# Altium PCB ECG_Final.PcbDoc (part 1 of 3)
Units mil, origin at the board's own origin, x right, y up, seen from the top; angles counter-clockwise.
Board outline 2555.63 x 1380.57 mil, 4 copper layers (Top Layer, Layer 1, Layer 2, Bottom Layer), stack 61.583 mil thick; 110 components, 95 nets, 402 pads, 94 vias.
Unrouted connection lines stored in the file: 82.
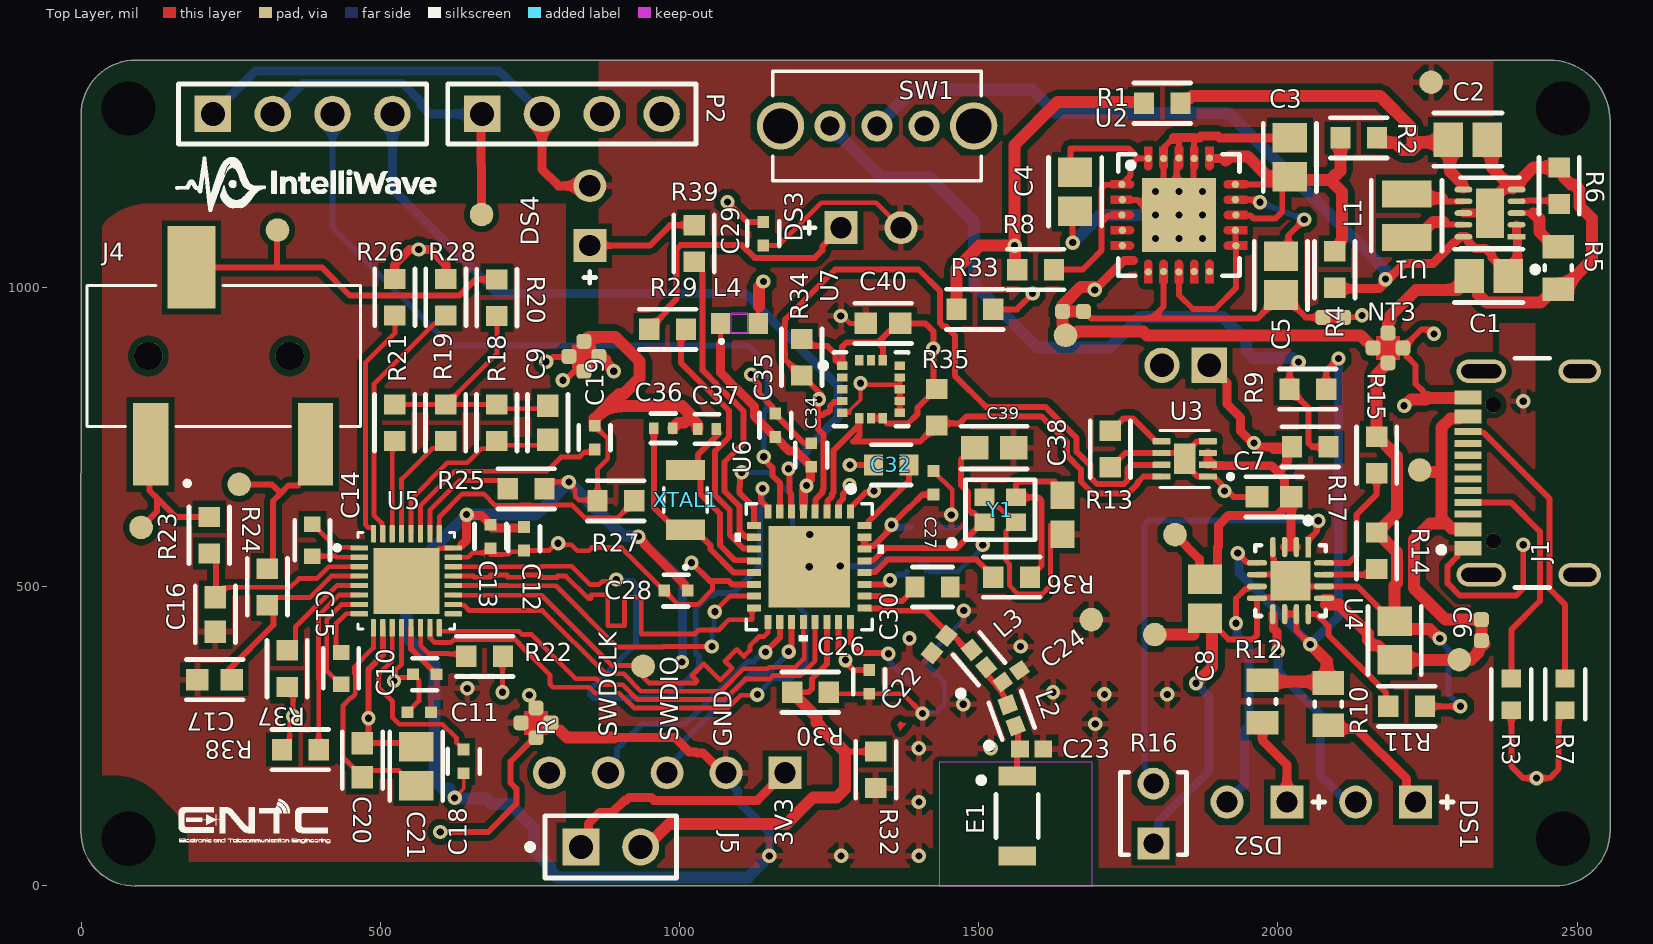
[diagram p0: Top Layer view]
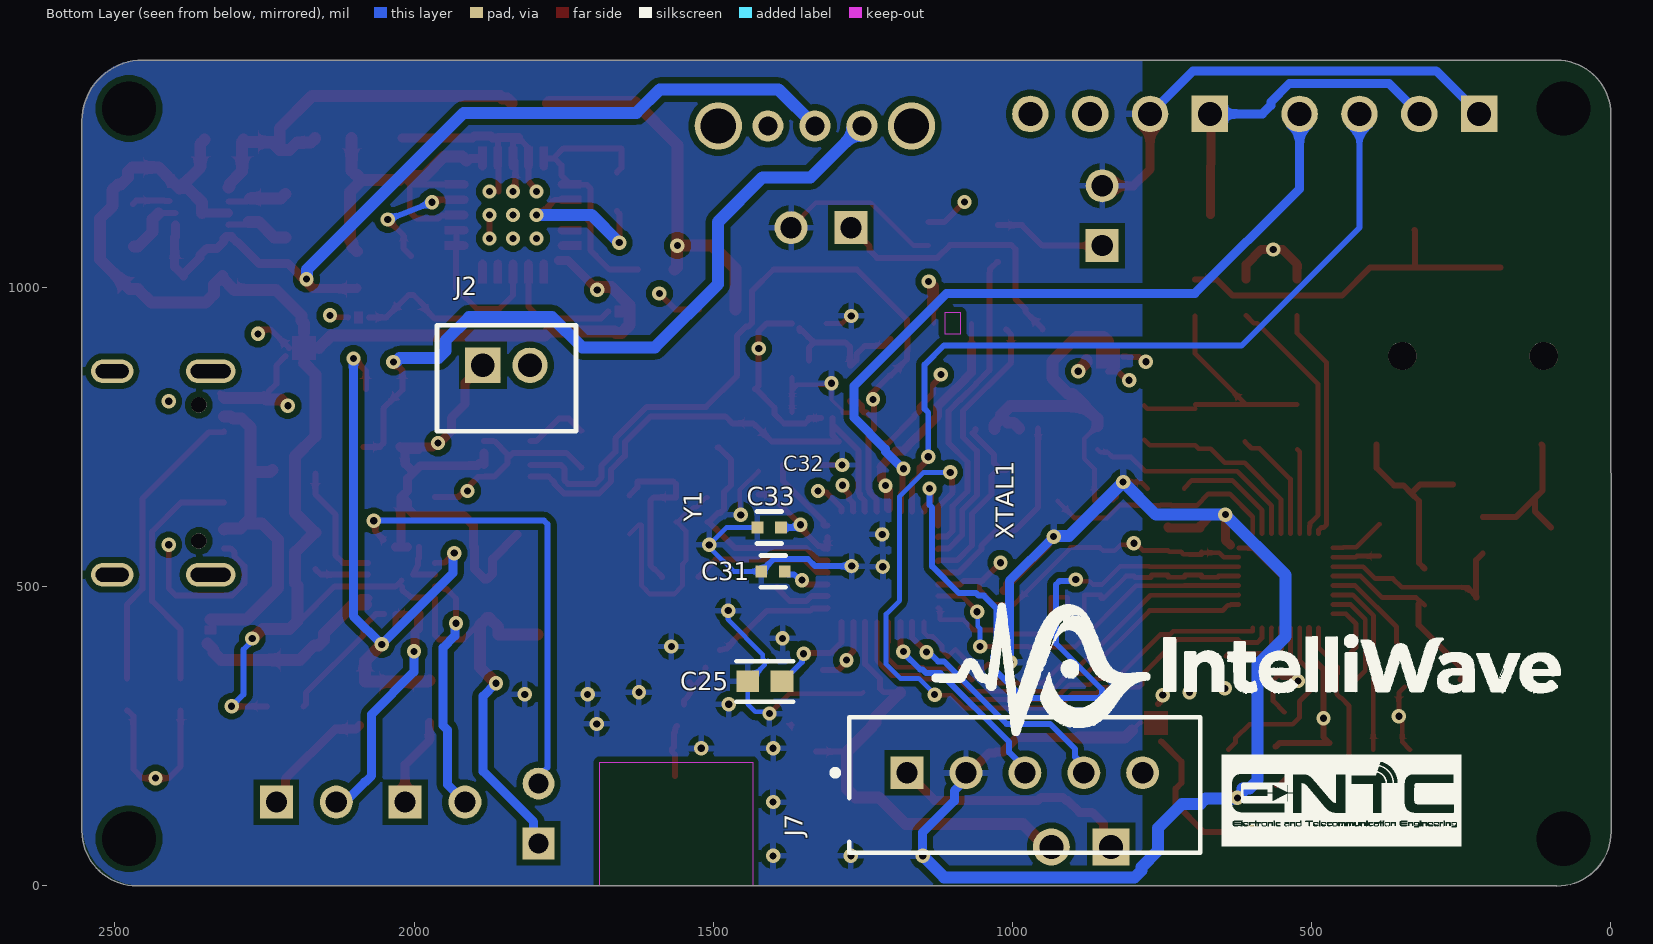
[diagram p1: Bottom Layer view, seen from below]
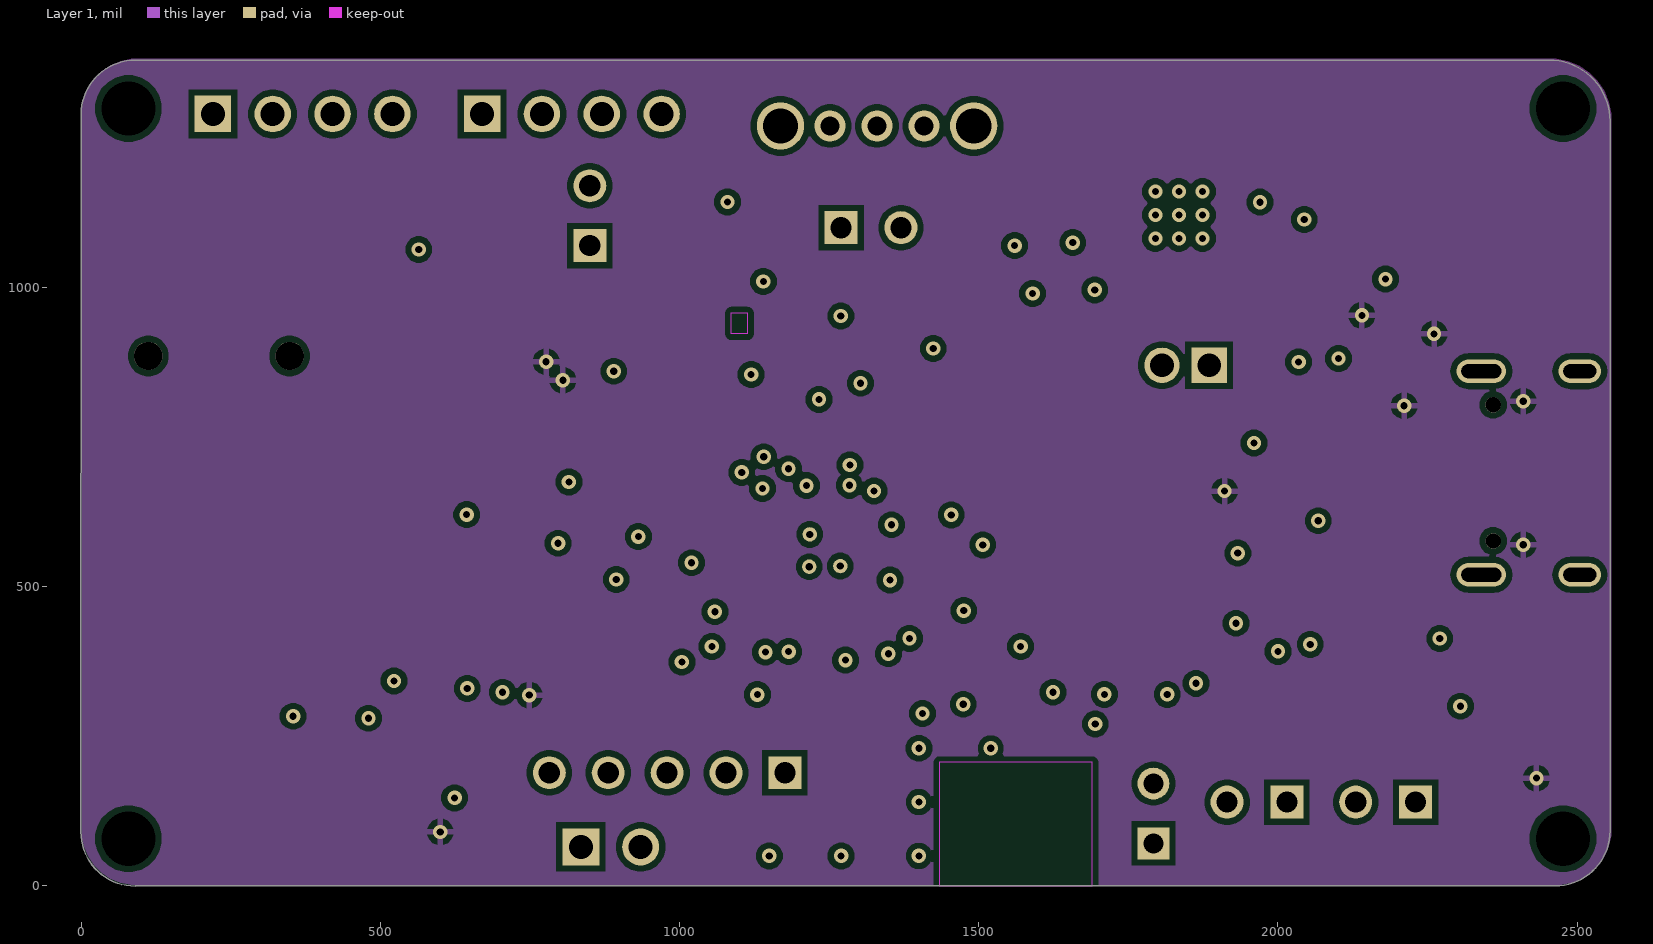
[diagram p2: Layer 1]
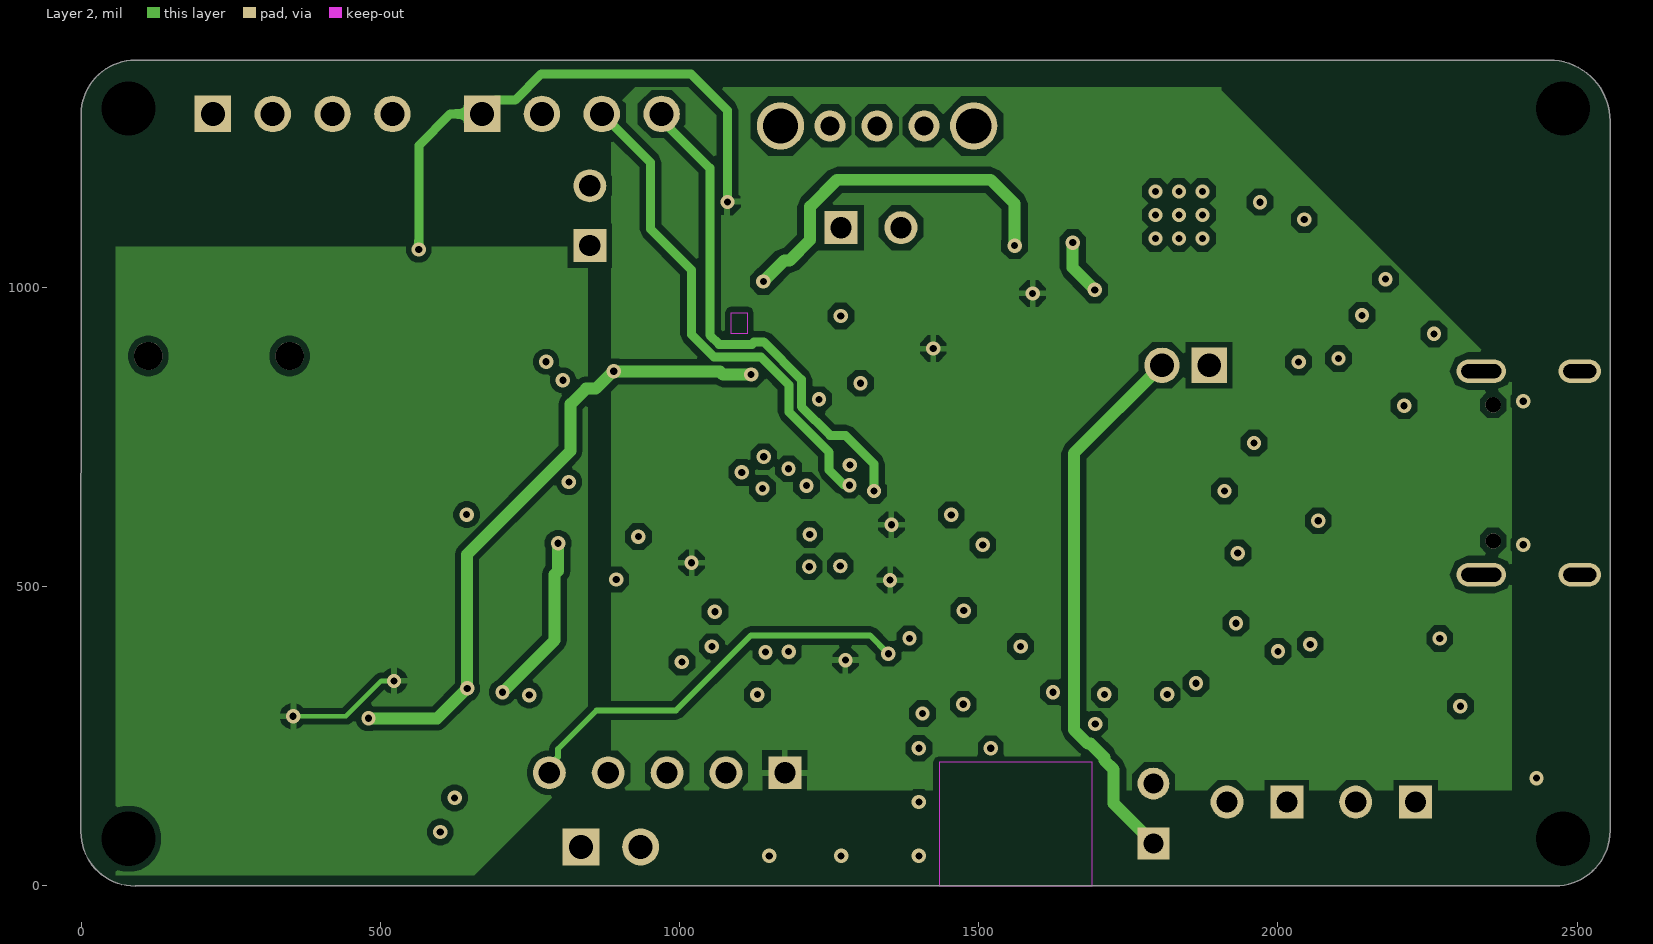
[diagram p3: Layer 2]
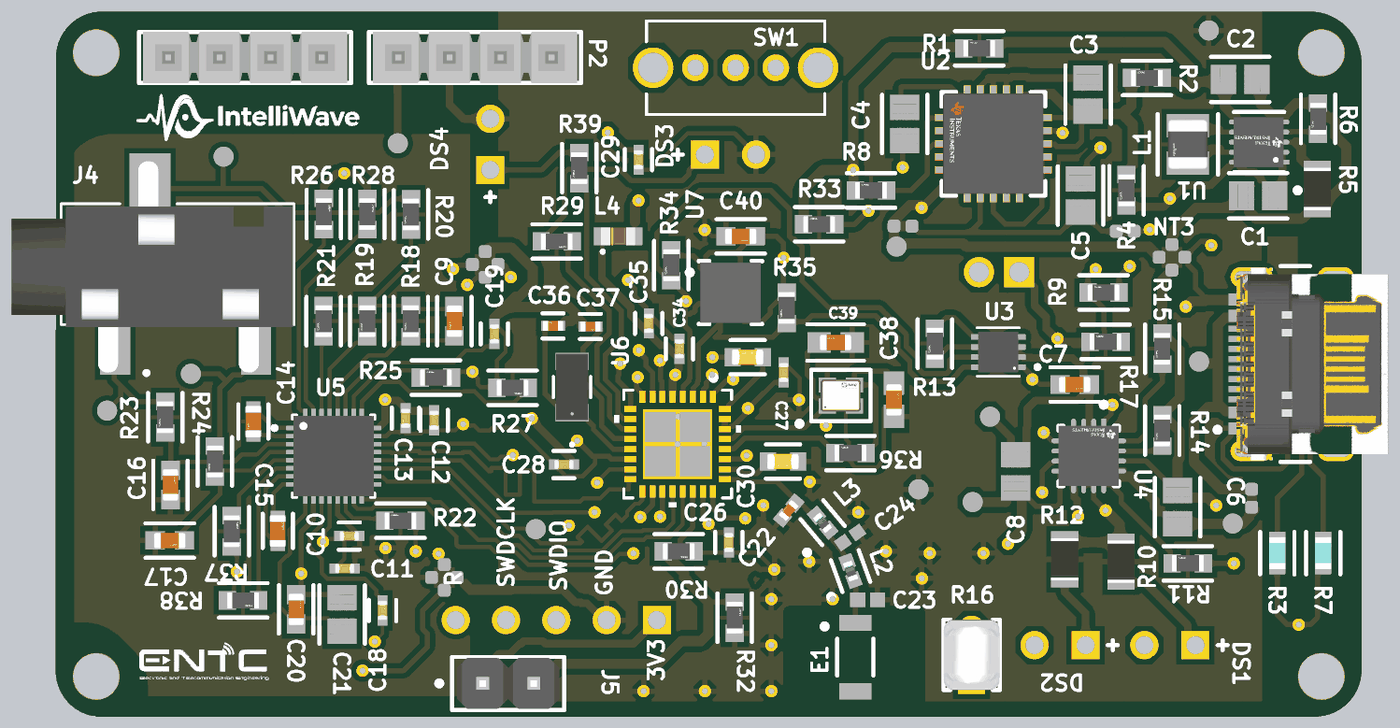
[diagram p5: 3D render of the assembled board from above, using the file's embedded part models]
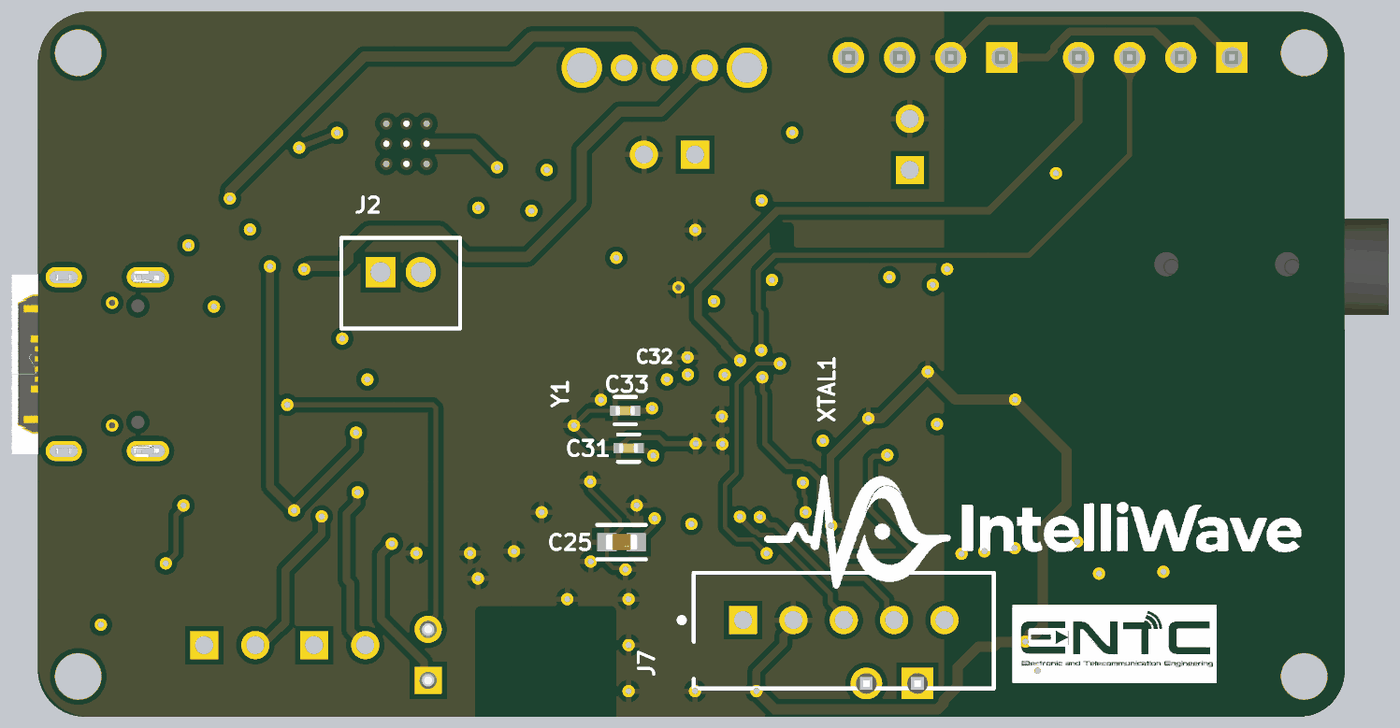
[diagram p6: 3D render of the assembled board from below, using the file's embedded part models]

## Layer stack, top to bottom
Top Solder: solder mask 0.4, Solder Resist, Dk 3.5
Top Layer: signal copper 1.378
Dielectric 2: prepreg 3.9134, PP-006, Dk 4.1
Layer 1: signal copper 0.5984
Dielectric 1: dielectric 49.8031, FR-4, Dk 4.8
Layer 2: signal copper 0.5984
Dielectric 3: prepreg 3.9134, PP-006, Dk 4.1
Bottom Layer: signal copper 1.378
Bottom Solder: solder mask 0.4, Solder Resist, Dk 3.5

## Board outline
-0.55,90 ccw(c90,90) 90,-0.55 90,0 2463.35,0 ccw(c2463.35,91.72) 2555.08,91.72 2555.08,1278.26 ccw(c2453.32,1278.26) 2453.32,1380.02 90.57,1380.02 90.55,1380 ccw(c90.55,1289.45) 0,1289.45

## Design rules (kind name [scope] priority, off if disabled: settings)
Clearance [All] p1: gap=10 ignorepadtopadclearanceinfootprint=FALSE except(5.91: Arc-SMDPad Track-SMDPad SMDPad-SMDPad; 6: Arc-Arc Arc-Track Arc-Text Track-Track Track-Text SMDPad-Text THPad-Text Via-Text Fill-Text Poly-Text Region-Text Text-Text)
MatchedLengths SPI_LENGTH_MATCH [InNetClass('SPI_MCU')] p1: tolerance=39.37 checknetsindiffpair=FALSE checkdiffpairvsdiffpair=TRUE checkxsignals=TRUE checkothers=TRUE
MinimumSolderMaskSliver [All] p1: minsoldermaskwidth=5.91
PolygonConnect [All] p1: connectstyle=Relief reliefconductorwidth=10 reliefentries=4 polygonreliefangle="90 Angle" airgapwidth=10
RoutingVias [All] p1: holewidth=28 width=50 viastyle="Through Hole" minholewidth=28 minwidth=50 maxholewidth=28 maxwidth=50
SilkToSilkClearance [All] p1: silktosilkclearance=6
SilkToSolderMaskClearance [IsPad] p1: minsilkscreentomaskgap=5.51 clearancetoexposedcopper=TRUE
SolderMaskExpansion [All] p1: expansion=0 istentingtop=FALSE
SupplyNets "Schematic Supply Nets_3" [InNet('DVDD')] p1: voltage=0.000
SupplyNets "Schematic Supply Nets_2" [InNet('Vin')] p2: voltage=0.000
SupplyNets "Schematic Supply Nets_1" [InNet('AVDD')] p3: voltage=0.000
SupplyNets "Schematic Supply Nets" [InNet('GND')] p4: voltage=0.000
Width [All] p1: maxlimit=30 minlimit=4 preferedwidth=10
27 further rules are at their usual default settings.

## Classes and differential pairs
net class SPI_MCU: ADS_CS ADS_DIN ADS_DOUT ADS_SCLK
component class ECG_PWR_MGMT: C1 C2 C3 C4 C5 C6 C7 C8 DS1 DS2 J1 J2 L1 NT3 R1 R2 R3 R4 R5 R6 R7 R8 R9 R10 R11 R12 R13 R14 R15 R16 R17 SW1 U1 U2 U3 U4
component class ECG_AFE_ADS1292: C9 C10 C11 C12 C13 C14 C15 C16 C17 C18 C19 C20 J4 R18 R19 R20 R21 R22 R23 R24 R25 R26 R27 R28 R37 R38 U5

## Components (designator, comment, footprint, x,y, rotation, side; value= is the part's Value field where it differs from the comment)
*1 "NET-TIE SMD" "NET TIE SMD" 760,277.5 r0 top net-tie
C1 "10uF" CAP-0805-IPC_B 2352.49,1019.33 r0 top value=10µF
C2 "22uF" CAP-0805-IPC_B 2317.49,1247.12 r180 top value=22µF
C3 "10uF" CAP-0805-IPC_B 2020,1217.49 r270 top value=10µF
C4 "10uF" CAP-0805-IPC_B 1661,1160 r90 top value=10µF
C5 "1uF" CAP-0805-IPC_B 2005,1020 r90 top
C6 "1uF" CAP-0805-IPC_B 2195,410 r270 top
C7 "100nF" CAP-0603-IPC_B 1993.61,650 r0 top
C8 "4.7uF" CAP-0805-IPC_B 1878,480 r90 top
C9 "6.8nF" CAP-0603-IPC_B 779.68,774.03 r270 top
C10 "100nF, 402" FP-CC0402-MFG 574.13,353.55 r0 top value="100 nF"
C11 "1uF, 402" FP-CC0402-MFG 565,290 r180 top value="1 uF"
C12 "1uF, 402" FP-CC0402-MFG 740,580 r90 top value="1 uF"
C13 "100nF, 402" FP-CC0402-MFG 684.13,583.94 r270 top value="100 nF"
C14 "4.7nF 402" FP-GRM188-0_1-e0_2_0_5-MFG 386.23,577.63 r270 top
C15 "4.7nF 402" FP-GRM188-0_1-e0_2_0_5-MFG 434.13,363.55 r90 top
C16 "1nF,603" CAP-0603-IPC_B 224.13,453.55 r90 top
C17 "1nF,603" CAP-0603-IPC_B 222.75,344.65 r0 top
C18 "1uF, 402" FP-CC0402-MFG 639,208 r90 top value="1 uF"
C19 "1uF, 402" FP-CC0402-MFG 858.06,749.08 r270 top value="1 uF"
C20 "100nF,603" CAP-0603-IPC_B 470,210 r90 top
C21 "10uF,805" CAP-0805-IPC_B 560,200 r90 top value=10µF
C22 "2.7pF, 402" FP-GJM155-0_05-IPC_A 1434.13,403.55 r230 top
C23 "1.5pF, 402" CAPC1005X55X25ML05T10 1588.43,228.75 r180 top
C24 "3.9pF, 402" CAPC1005X55X25NL05T10 1554.23,350.62 r35 top
C25 "100nF 603" CAP-0603-IPC_B 1413.76,341.59 r180 bottom
C26 "100nF, 402" FP-CC0402-MFG 1316.87,340.84 r270 top value="100 nF"
C27 "100nF, 402" FP-CC0402-MFG 1424.13,673.55 r90 top value="100 nF"
C28 "100nF, 402" FP-CC0402-MFG 994.13,493.55 r0 top value="100 nF"
C29 "100nF, 402" FP-CC0402-MFG 1140,1090 r270 top value="100 nF"
C30 "470nF,603" FP-CC0603-DA-MFG 1422.8,499.33 r0 top value="470 nF"
C31 "100nF,402" FP-CC0402-MFG 1400.07,525.42 r0 bottom value="100 nF"
C32 "4.7uF , 603" FP-CC0603-DA-MFG 1353.66,703.55 r180 top value="4.7 uF"
C33 "100nF, 402" FP-CC0402-MFG 1406.54,598.75 r0 bottom value="100 nF"
C34 "100nF, 402" FP-CC0402-MFG 1220,720 r90 top value="100 nF"
C35 "1uF, 402" FP-CC0402-MFG 1160,769.68 r90 top value="1 uF"
C36 "6nF" FP-GJM155-0_05-MFG 972.82,764.68 r180 top
C37 "6nF" FP-GJM155-0_05-MFG 1045.81,763.55 r0 top
C38 "CAP-0603-16pF" FP-GCM188-0_1-IPC_A_murata 1640,620 r90 top
C39 "CAP-0603-16pF" FP-GCM188-0_1-IPC_A_murata 1525.71,732.25 r180 top
C40 "100nF" CAP-0603-IPC_B 1340,940 r0 top
DS1 "LTL-1CHG" LTST-LTL-1CHG-2 2180,140 r180 top
DS2 "LTL-1CHG" LTST-LTL-1CHG-2 1965,140 r180 top
DS3 "LTL-1CHG" LTST-LTL-1CHG-2 1320,1100 r0 top
DS4 "LTL-1CHG" LTST-LTL-1CHG-2 850,1120 r90 top
E1 "2450AT18A100E" JT-2450AT18A100-2_V 1564.13,116.62 r270 top
J1 "USB4105-GF-A" FP-USB4105-GF-A-MFG 2458.7,690.08 r90 top locked
J2 "B2B-PH-K-S(LF)(SN)" JST-B2B-PH-K-S_V 1845.63,848.35 r180 bottom locked
J4 "3.5mm audio PJ-320B" "3.5mm Audio PJ-320B" 230.13,885.55 r0 top
J5 "M20-9990246" FP-M20-9990246-MFG 885,65 r0 top
J7 "B5B-XH-AM(LF)(SN)" FP-B5B-XH-AM_LF_SN-MFG 979.15,168.33 r0 bottom
L1 "LQM2HPN2R2MG0L" FP-LQM2HPN_G0-IPC_C 2215,1120 r270 top
L2 "1.8nH" FP-LQG15HH_02-IPC_A 1555,285 r110 top
L3 "1.3nH" FP-LQG15HH_02-IPC_A 1500.48,379.67 r130 top
L4 "Ferrite bead" IND_LSMG_160808_TAY 1100,940 r0 top
NT1 "NET-TIE 2pin SMD" "NET TIE SMD 2 pin" 2340,430 r90 top net-tie
NT2 "NET-TIE 2pin SMD" "NET TIE SMD 2 pin" 1660,960 r0 top net-tie
NT3 "NET-TIE SMD" "NET TIE SMD" 2179.01,899.01 r90 top net-tie
NT4 "NET-TIE 2pin SMD" "NET TIE SMD 2 pin" 2090,950 r180 top net-tie
NT5 "NET-TIE SMD" "NET TIE SMD" 840,880 r180 top net-tie
P1 "TSW-104-08-G-S" SMTC-TSW-104-08-X-S 220,1290 r0 top
P2 "TSW-104-08-G-S" SMTC-TSW-104-08-X-S 670,1290 r0 top
R1 "0 ohm" RES-0603-IPC_B 1806.8,1307.96 r180 top
R2 "0 ohm" RES-0603-IPC_B 2135,1250 r180 top
R3 "RK73H1JRTTD5101F" FP-RK73H1J-IPC_C 2390,320 r90 top
R4 "0 ohm" RES-0603-IPC_B 2095,1030 r270 top
R5 "1.87k" "RES 0805 Medium" 2468.41,1032.79 r90 top value=1.87kΩ
R6 "8.25k" RES-0603-IPC_B 2470,1170 r270 top value=8.25kΩ
R7 "RK73H1JRTTD5101F" FP-RK73H1J-IPC_C 2480,320 r90 top
R8 "0 ohm" RES-0603-IPC_B 1595,1030 r180 top
R9 "0 ohm" RES-0603-IPC_B 2050,830 r180 top
R10 "1.5k" "RES 0805 Medium" 2084.13,303.55 r90 top
R11 "1.18k" RES-0603-IPC_B 2215,300 r180 top
R12 "1.5k" "RES 0805 Medium" 1974.13,308.12 r90 top
R13 "1k RES-0603-IPC-B_1" RES-0603-IPC_B 1720,730 r270 top
R14 "4.12k" RES-0603-IPC_B 2165,560 r270 top
R15 "1.13k" RES-0603-IPC_B 2165,720 r270 top
R16 "NTCLE101E3C90173" FP-NTCLE101E3C90173-MFG 1792,121 r90 top
R17 "0 ohm" RES-0603-IPC_B 2054.13,733.55 r180 top
R18 "1M 603" RES-0603-IPC_B 694.4,774.03 r270 top
R19 "100k 603" RES-0603-IPC_B 609.12,774.03 r270 top
R20 "100k" RES-0603-IPC_B 694.7,982.97 r270 top
R21 "0ohm ,603" RES-0603-IPC_B 523.84,774.03 r270 top
R22 "10k,603" RES-0603-IPC_B 674.13,383.55 r180 top
R23 "2.2k 603" RES-0603-IPC_B 213.94,586.08 r270 top
R24 "2.2k 603" RES-0603-IPC_B 310.96,499.48 r270 top
R25 "10k" RES-0603-IPC_B 743.56,663.55 r180 top
R26 "10k,603" RES-0603-IPC_B 524.13,983.79 r90 top
R27 "10k" RES-0603-IPC_B 893.52,643.55 r0 top
R28 "10k,603" RES-0603-IPC_B 609.42,983.79 r90 top
R29 "S" RES-0603-IPC_B 980,930 r0 top
R30 "10k 603" RES-0603-IPC_B 1218.72,323.53 r0 top
R32 "100k" RES-0603-IPC_B 1328.23,193.87 r90 top
R33 "0 ohm" RES-0603-IPC_B 1493.56,963.55 r180 top
R34 "10k" RES-0603-IPC_B 1204.13,883.55 r270 top
R35 "10k" RES-0603-IPC_B 1430,800 r270 top
R36 "0 ohm" RES-0603-IPC_B 1554.95,515.81 r180 top
R37 "1M 603" RES-0603-IPC_B 344.13,362.97 r90 top
R38 "1M 603" RES-0603-IPC_B 366.28,227.58 r0 top
R39 "S" RES-0603-IPC_B 1024.13,1073.55 r270 top
SW1 "OS102011MA1QN1" OS102011MA1QN1_CNK 1251.26,1270 r0 top
U1 "TPS63900DSKR" FP-DSK0010A-IPC_C 2354.41,1124.37 r180 top
U2 "TPS7A4700RGWR" FP-RGW0020A-MFG 1834.49,1121.18 r0 top
U3 "MAX17048G+T10" max17048g+t10 1844.13,713.55 r180 top
U4 "BQ24074RGTR" FP-RGT0016C-IPC_B 2021.03,510.16 r270 top
U5 "ADS1292IRSMR" "ADS1292 SMD 32 PIN" 543.33,509.75 r0 top
U6 "STM32WBA52KGU6" UFQFPN-32_STM 1216.65,533.39 r270 top
U7 "LIS3DHTR" FP-LGA-16-7983231-MFG 1320,830 r0 top
XTAL1 "NX3215SA-32.768K-STD-MUA-14" XTAL_NX3215SA_NDK-M 1010,645 r90 top
Y1 "NX2016SA-32MHZ-EXS00A-CS06654" FP-NX2016SA-MFG 1535.93,628.51 r0 top

## Footprints (in the part's own frame and the unit in brackets; to place one, negate y for a bottom-side part, rotate by r counter-clockwise, add the part's x,y. Pads: shape width x height; smd on the part's side, far side on the other; paste and mask are expansions set on the pad)
"3.5mm Audio PJ-320B" [mm]
  rect 1.5x3.5 smd: 1(-2.9,-3.75) 3(4.1,-3.75)
  rect 2.032x3.5 smd: 2(-1.168,3.759)
  round 1.2 hole 1.2 unplated: ""(-3,0) ""(3,0)
  silkscreen extent -5.59,-5.51 6,3, body extent -8.06,-5.38 5.94,5.12, height 5
"ADS1292 SMD 32 PIN" [mm]
  rrect25% 0.74x0.22 smd: 1(-1.995,1.4) 2(-1.995,1) 3(-1.995,0.6) 4(-1.995,0.2) 5(-1.995,-0.2) 6(-1.995,-0.6) 7(-1.995,-1) 8(-1.995,-1.4) 17(1.995,-1.4) 18(1.995,-1) 19(1.995,-0.6) 20(1.995,-0.2) 21(1.995,0.2) 22(1.995,0.6) 23(1.995,1) 24(1.995,1.4)
  rrect25% 0.22x0.74 smd: 9(-1.4,-1.995) 10(-1,-1.995) 11(-0.6,-1.995) 12(-0.2,-1.995) 13(0.2,-1.995) 14(0.6,-1.995) 15(1,-1.995) 16(1.4,-1.995) 25(1.4,1.995) 26(1,1.995) 27(0.6,1.995) 28(0.2,1.995) 29(-0.2,1.995) 30(-0.6,1.995) 31(-1,1.995) 32(-1.4,1.995)
  rect 2.8x2.8 smd paste-2: 33(0,0)
  silkscreen extent -3.03,-2.05 2.05,2.05, body extent -2,-2 2,2, height 1
CAP-0603-IPC_B [mil]
  rect 37.74x35.91 smd paste+0 mask+0: 1(-28.61,0) 2(28.61,0)
  silkscreen extent -47,-34 47,34, body extent -57,-28 57,28, height 10
CAP-0805-IPC_B [mil]
  rect 49.4x57.33 smd paste+0 mask+0: 1(-32.51,0) 2(32.51,0)
  silkscreen extent -57,-44 57,44, body extent -67,-39 67,39, height 10
CAPC1005X55X25ML05T10 [mm] "Chip Capacitor, 2-Leads, Body 1.00x0.50mm, IPC Low Density"
  rect 0.76x0.72 smd: 1(-0.49,0) 2(0.49,0)
  body extent -0.53,-0.28 0.53,0.27, height 0.55
CAPC1005X55X25NL05T10 [mm] "Chip Capacitor, 2-Leads, Body 1.00x0.50mm, IPC Medium Density"
  rect 0.66x0.62 smd: 1(-0.44,0) 2(0.44,0)
  body extent -0.52,-0.28 0.53,0.28, height 0.55
FP-B5B-XH-AM_LF_SN-MFG [mm]
  rect 1.4x1.4 hole 0.9 paste-2539.97 mask+0: 1(5,-0.525)
  round 1.4 hole 0.9 paste-2539.97 mask+0: 2(2.5,-0.525) 3(0,-0.525) 4(-2.5,-0.525) 5(-5,-0.525)
  silkscreen extent -7.45,-2.88 8.18,2.88
FP-CC0402-MFG [mm]
  rect 0.5x0.5 smd paste+0 mask+0: 1(-0.5,0) 2(0.5,0)
  silkscreen extent -0.53,-0.68 0.53,0.67, body extent -0.87,-0.48 0.87,0.48, height 0.25
FP-CC0603-DA-MFG [mm]
  rect 0.8x0.9 smd paste+0 mask+0: 1(-0.75,0) 2(0.75,0)
  silkscreen extent -0.85,-0.85 0.85,0.85, body extent -0.8,-0.4 0.8,0.4, height 0.9
FP-DSK0010A-IPC_C [mm]
  rect 0.756x0.242 smd paste+0 mask+0: 1(-1.128,1)
  rrect100% 0.756x0.242 smd paste+0 mask+0: 2(-1.128,0.5) 3(-1.128,0) 4(-1.128,-0.5) 5(-1.128,-1) 6(1.128,-1) 7(1.128,-0.5) 8(1.128,0) 9(1.128,0.5) 10(1.128,1)
  rect 1.2x2.1 smd paste-1000 mask+0: 11(0,0)
  silkscreen extent -2.04,-1.5 1.25,2.52, body extent -1.61,-1.35 1.61,1.35, height 0.25
FP-GCM188-0_1-IPC_A_murata [mil]
  rect 45.62x39.85 smd paste+0 mask+0: 1(-32.55,0) 2(32.55,0)
  body extent -75,-40 75,40, height 10
FP-GJM155-0_05-IPC_A [mil]
  rect 28.16x26.48 smd paste+0 mask+0: 1(-18.84,0) 2(18.84,0)
  body extent -41,-21 41,21, height 10
FP-GJM155-0_05-MFG [mm]
  rect 0.4x0.5 smd paste+0 mask+0: 1(-0.4,0) 2(0.4,0)
  silkscreen extent -0.53,-0.63 0.53,0.63, body extent -0.7,-0.38 0.7,0.38, height 0.25
FP-GRM188-0_1-e0_2_0_5-MFG [mm]
  rect 0.65x0.7 smd paste+0 mask+0: 1(-0.675,0) 2(0.675,0)
  silkscreen extent -0.85,-0.75 0.85,0.75, body extent -1.1,-0.55 1.1,0.55, height 0.25
FP-LGA-16-7983231-MFG [mm]
  rect 0.45x0.35 smd paste-1000 mask+0: 1(-1.225,1) 2(-1.225,0.5) 3(-1.225,0) 4(-1.225,-0.5) 5(-1.225,-1) 9(1.225,-1) 10(1.225,-0.5) 11(1.225,0) 12(1.225,0.5) 13(1.225,1)
  rect 0.35x0.45 smd paste-1000 mask+0: 6(-0.5,-1.225) 7(0,-1.225) 8(0.5,-1.225) 14(0.5,1.225) 15(0,1.225) 16(-0.5,1.225)
  silkscreen extent -2.15,-1.58 1.58,1.58, body extent -2.07,-2.07 2.07,2.07, height 0.25
FP-LQG15HH_02-IPC_A [mil]
  rect 28.16x26.48 smd paste+0 mask+0: 1(-18.84,0) 2(18.84,0)
  silkscreen extent -39,-29 33,58, body extent -41,-21 41,21, height 10
FP-LQM2HPN_G0-IPC_C [mil]
  rect 45.47x82.92 smd paste+0 mask+0: 1(-36.44,0) 2(36.44,0)
  silkscreen extent -59,-59 59,59, body extent -63,-47 63,47, height 10
FP-M20-9990246-MFG [mm]
  rect 1.57x1.57 hole 1.02 paste-2539.97 mask+0: 1(-1.27,0)
  round 1.57 hole 1.02 paste-2539.97 mask+0: 2(1.27,0)
  silkscreen extent -3.55,-1.32 2.79,1.32, body extent -2.89,-1.42 2.89,1.42, height 0.25
FP-NTCLE101E3C90173-MFG [mm]
  rect 1.35x1.35 hole 0.85 paste-2539.97 mask+0: 1(-1.27,0)
  round 1.35 hole 0.85 paste-2539.97 mask+0: 2(1.27,0)
  silkscreen extent -1.75,-1.4 1.75,1.4, body extent -2.04,-1.5 2.04,1.5, height 0.25
FP-NX2016SA-MFG [mm]
  rect 0.85x0.75 smd paste+0 mask+0: 1(-0.675,-0.525) 2(0.675,-0.525) 3(0.675,0.525) 4(-0.675,0.525)
  silkscreen extent -2.18,-1.53 1.48,1.28, body extent -1.2,-1 1.2,1, height 0.25
FP-RGT0016C-IPC_B [mm]
  rect 0.866x0.239 smd paste+0 mask+0: 1(-1.423,0.75)
  rrect100% 0.866x0.239 smd paste+0 mask+0: 2(-1.423,0.25) 3(-1.423,-0.25) 4(-1.423,-0.75) 9(1.423,-0.75) 10(1.423,-0.25) 11(1.423,0.25) 12(1.423,0.75)
  rrect100% 0.239x0.866 smd paste+0 mask+0: 5(-0.75,-1.423) 6(-0.25,-1.423) 7(0.25,-1.423) 8(0.75,-1.423) 13(0.75,1.423) 14(0.25,1.423) 15(-0.25,1.423) 16(-0.75,1.423)
  rect 1.68x1.68 smd paste-1000 mask+0: 17(0,0)
  silkscreen extent -2.67,-1.5 1.5,1.5, body extent -2.11,-2.11 2.11,2.11, height 0.25
FP-RGW0020A-MFG [mm]
  round 0.315 smd paste-1000 mask+0: 1(-2.418,1.3) 2(-2.4,0.65) 3(-2.418,0) 4(-2.4,-0.65) 5(-2.4,-1.3) 6(-1.3,-2.418) 7(-0.65,-2.4) 8(0,-2.418) 9(0.65,-2.4) 10(1.3,-2.4) 11(2.418,-1.3) 12(2.4,-0.65) 13(2.418,0) 14(2.4,0.65) 15(2.4,1.3) 16(1.3,2.418) 17(0.65,2.4) 18(0,2.418) 19(-0.65,2.4) 20(-1.3,2.4)
  rect 3.15x3.15 smd paste-1000 mask+0: 21(0,0)
  Top Layer region: -1.125,2.9 -1.125,2.075 -1.138,2.008 -1.176,1.951 -1.233,1.913 -1.3,1.9 -1.3,1.9 -1.367,1.913 -1.424,1.951 -1.462,2.008 -1.475,2.075 -1.475,2.075 -1.475,2.9
  Top Layer region: -0.475,2.9 -0.475,2.075 -0.488,2.008 -0.526,1.951 -0.583,1.913 -0.65,1.9 -0.65,1.9 -0.717,1.913 -0.774,1.951 -0.812,2.008 -0.825,2.075 -0.825,2.075 -0.825,2.9
  Top Layer region: 0.175,2.9 0.175,2.075 0.162,2.008 0.124,1.951 0.067,1.913 0,1.9 0,1.9 -0.067,1.913 -0.124,1.951 -0.162,2.008 -0.175,2.075 -0.175,2.075 -0.175,2.9
  Top Layer region: 0.825,2.9 0.825,2.075 0.812,2.008 0.774,1.951 0.717,1.913 0.65,1.9 0.65,1.9 0.583,1.913 0.526,1.951 0.488,2.008 0.475,2.075 0.475,2.075 0.475,2.9
  Top Layer region: 1.475,2.9 1.475,2.075 1.462,2.008 1.424,1.951 1.367,1.913 1.3,1.9 1.3,1.9 1.233,1.913 1.176,1.951 1.138,2.008 1.125,2.075 1.125,2.075 1.125,2.9
  Top Layer region: 1.125,-2.9 1.125,-2.075 1.138,-2.008 1.176,-1.951 1.233,-1.913 1.3,-1.9 1.3,-1.9 1.367,-1.913 1.424,-1.951 1.462,-2.008 1.475,-2.075 1.475,-2.075 1.475,-2.9
  Top Layer region: 0.475,-2.9 0.475,-2.075 0.488,-2.008 0.526,-1.951 0.583,-1.913 0.65,-1.9 0.65,-1.9 0.717,-1.913 0.774,-1.951 0.812,-2.008 0.825,-2.075 0.825,-2.075 0.825,-2.9
  Top Layer region: -0.175,-2.9 -0.175,-2.075 -0.162,-2.008 -0.124,-1.951 -0.067,-1.913 0,-1.9 0,-1.9 0.067,-1.913 0.124,-1.951 0.162,-2.008 0.175,-2.075 0.175,-2.075 0.175,-2.9
  Top Layer region: -0.825,-2.9 -0.825,-2.075 -0.812,-2.008 -0.774,-1.951 -0.717,-1.913 -0.65,-1.9 -0.65,-1.9 -0.583,-1.913 -0.526,-1.951 -0.488,-2.008 -0.475,-2.075 -0.475,-2.075 -0.475,-2.9
  Top Layer region: -1.475,-2.9 -1.475,-2.075 -1.462,-2.008 -1.424,-1.951 -1.367,-1.913 -1.3,-1.9 -1.3,-1.9 -1.233,-1.913 -1.176,-1.951 -1.138,-2.008 -1.125,-2.075 -1.125,-2.075 -1.125,-2.9
  Top Layer region: 2.9,1.125 2.075,1.125 2.008,1.138 1.951,1.176 1.913,1.233 1.9,1.3 1.9,1.3 1.913,1.367 1.951,1.424 2.008,1.462 2.075,1.475 2.075,1.475 2.9,1.475
  Top Layer region: 2.9,0.475 2.075,0.475 2.008,0.488 1.951,0.526 1.913,0.583 1.9,0.65 1.9,0.65 1.913,0.717 1.951,0.774 2.008,0.812 2.075,0.825 2.075,0.825 2.9,0.825
  Top Layer region: 2.9,-0.175 2.075,-0.175 2.008,-0.162 1.951,-0.124 1.913,-0.067 1.9,0 1.9,0 1.913,0.067 1.951,0.124 2.008,0.162 2.075,0.175 2.075,0.175 2.9,0.175
  Top Layer region: 2.9,-0.825 2.075,-0.825 2.008,-0.812 1.951,-0.774 1.913,-0.717 1.9,-0.65 1.9,-0.65 1.913,-0.583 1.951,-0.526 2.008,-0.488 2.075,-0.475 2.075,-0.475 2.9,-0.475
  Top Layer region: 2.9,-1.475 2.075,-1.475 2.008,-1.462 1.951,-1.424 1.913,-1.367 1.9,-1.3 1.9,-1.3 1.913,-1.233 1.951,-1.176 2.008,-1.138 2.075,-1.125 2.075,-1.125 2.9,-1.125
  Top Layer region: -2.9,-1.125 -2.075,-1.125 -2.008,-1.138 -1.951,-1.176 -1.913,-1.233 -1.9,-1.3 -1.9,-1.3 -1.913,-1.367 -1.951,-1.424 -2.008,-1.462 -2.075,-1.475 -2.075,-1.475 -2.9,-1.475
  Top Layer region: -2.9,-0.475 -2.075,-0.475 -2.008,-0.488 -1.951,-0.526 -1.913,-0.583 -1.9,-0.65 -1.9,-0.65 -1.913,-0.717 -1.951,-0.774 -2.008,-0.812 -2.075,-0.825 -2.075,-0.825 -2.9,-0.825
  Top Layer region: -2.9,0.175 -2.075,0.175 -2.008,0.162 -1.951,0.124 -1.913,0.067 -1.9,0 -1.9,0 -1.913,-0.067 -1.951,-0.124 -2.008,-0.162 -2.075,-0.175 -2.075,-0.175 -2.9,-0.175
  Top Layer region: -2.9,0.825 -2.075,0.825 -2.008,0.812 -1.951,0.774 -1.913,0.717 -1.9,0.65 -1.9,0.65 -1.913,0.583 -1.951,0.526 -2.008,0.488 -2.075,0.475 -2.075,0.475 -2.9,0.475
  Top Layer region: -2.9,1.475 -2.075,1.475 -2.008,1.462 -1.951,1.424 -1.913,1.367 -1.9,1.3 -1.9,1.3 -1.913,1.233 -1.951,1.176 -2.008,1.138 -2.075,1.125 -2.075,1.125 -2.9,1.125
  silkscreen extent -2.58,-2.58 2.58,2.58, body extent -3,-3 3,3, height 0.25
FP-RK73H1J-IPC_C [mil]
  rect 29.75x31.97 smd paste+0 mask+0: 1(-26.59,0) 2(26.59,0)
  silkscreen extent -41,-33 41,33, body extent -31,-16 31,16, height 22
FP-USB4105-GF-A-MFG [mm]
  rrect100% 1x2.1 hole 1.7 slot 0.6 at 0 deg paste-2539.97 mask+0: 1(-4.32,3.015) 2(4.32,3.015)
  rrect100% 1x1.8 hole 1.4 slot 0.6 at 0 deg paste-2539.97 mask+0: 3(-4.32,-1.165) 4(4.32,-1.165)
  rect 0.6x1.15 smd paste+0 mask+0: A1-B12(-3.2,3.59) A4-B9(-2.4,3.59) B1-A12(3.2,3.59) B4-A9(2.4,3.59)
  rect 0.3x1.15 smd paste+0 mask+0: A5(-1.25,3.59) A6(-0.25,3.59) A7(0.25,3.59) A8(1.25,3.59) B5(1.75,3.59) B6(0.75,3.59) B7(-0.75,3.59) B8(-1.75,3.59)
  round 0.65 hole 0.65 unplated paste-2539.97 mask+0: ""(-2.89,2.515) ""(2.89,2.515)
  silkscreen extent -4.86,0.11 4.86,4.84, body extent -4.96,-3.94 4.96,4.27, height 0.25
IND_LSMG_160808_TAY [mil]
  rect 32x35 smd paste+0 mask+0: 1(-31.5,0) 2(31.5,0)
  Top Layer keep-out region: -13.5,-15.5 -13.5,15.5 13.5,15.5 13.5,-15.5
  Keep-Out Layer region: -13.5,-17.5 -13.5,17.5 13.5,17.5 13.5,-17.5
  silkscreen extent -33,-33 -27,-27, body extent -34,-17 34,17, height 35
JST-B2B-PH-K-S_V [mm] "Connector, 2-Leads, Body 5.9x4.5mm, Pitch 2mm"
  rect 1.5x1.5 hole 1: 1(-1,0.55)
  round 1.5 hole 1: 2(1,0.55)
  silkscreen extent -2.95,-2.25 2.95,2.25, body extent -2.95,-2.25 2.95,2.25, height 6
JT-2450AT18A100-2_V [mm] "Chip Antenna, 2-Leads, Body 3.4x1.8mm"
  rect 0.8x1.6 smd: 1(-1.7,0) 2(1.7,0)
  silkscreen extent -1.65,-1.65 0.91,0.9, body extent -1.7,-0.9 1.7,0.9, height 1.4
LTST-LTL-1CHG-2 [mm] "TH, 2-Leads, Dia 3.8mm"
  rect 1.4x1.4 hole 0.9: 1(-1.27,0)
  round 1.4 hole 0.9: 2(1.27,0)
  silkscreen extent -2.87,-0.25 -2.37,0.25, body extent -1.9,-1.9 1.9,1.9, height 6.5
max17048g+t10 [mm]
  rrect25% 0.76x0.27 smd: 1(-0.985,0.75) 2(-0.985,0.25) 3(-0.985,-0.25) 4(-0.985,-0.75) 5(0.985,-0.75) 6(0.985,-0.25) 7(0.985,0.25) 8(0.985,0.75)
  rect 0.9x1.3 smd paste-2: 9(0,0)
  silkscreen extent -2.04,-1.2 1.05,1.2, body extent -1,-1 1,1, height 0.8
"NET TIE SMD" [mil]
  rrect50% 25x25 smd mask+0: 1(-25,-5) 2(0,20) 3(25,-5) 4(0,-30)
  Top Layer region: -20,-25 20,-25 20,15 -20,15
"NET TIE SMD 2 pin" [mil]
  rrect50% 25x25 smd mask+0: 1(15,0) 2(-20,0)
  Top Layer region: -10.01,-10 4.99,-10 4.99,10 -10.01,10
OS102011MA1QN1_CNK [mil]
  round 52 hole 32 paste-99999 mask+0: 1(0,0) 2(78.74,0) 3(157.48,0)
  round 79 hole 59 paste-99999 mask+0: 4(-82.68,0) 5(240.16,0)
  silkscreen extent -96,-92 253,92
"RES 0805 Medium" [mm] "Chip Resistor, 2-Leads, Body 2.1x1.35mm, IPC Medium Density"
  rect 1x1.35 smd: 1(-0.9,0) 2(0.9,0)
  silkscreen extent -0.1,-0.58 0.1,0.58, body extent -1.05,-0.68 1.05,0.67, height 0.6
RES-0603-IPC_B [mil]
  rect 33.81x35.91 smd paste+0 mask+0: 1(-30.58,0) 2(30.58,0)
  silkscreen extent -47,-34 47,34, body extent -57,-28 57,28, height 10
SMTC-TSW-104-08-X-S [mm] ".025 SQ Post Terminal Strip Assembly, 1x4 Pins, Vertical, 2.54mm Pitch, Male"
  rect 1.55x1.55 hole 1.02: 1(0,0)
  round 1.55 hole 1.02: 2(2.54,0) 3(5.08,0) 4(7.62,0)
  silkscreen extent -1.46,-1.27 9.08,1.27, body extent -1.27,-1.27 8.89,1.27, height 8.38
UFQFPN-32_STM [mm]
  rect 0.6x0.3 smd paste-0.15: 1(-2.35,1.75) 2(-2.35,1.25) 3(-2.35,0.75) 4(-2.35,0.25) 5(-2.35,-0.25) 6(-2.35,-0.75) 7(-2.35,-1.25) 8(-2.35,-1.75) 17(2.35,-1.75) 18(2.35,-1.25) 19(2.35,-0.75) 20(2.35,-0.25) 21(2.35,0.25) 22(2.35,0.75) 23(2.35,1.25) 24(2.35,1.75)
  rect 0.3x0.6 smd paste-0.15: 9(-1.75,-2.35) 10(-1.25,-2.35) 11(-0.75,-2.35) 12(-0.25,-2.35) 13(0.25,-2.35) 14(0.75,-2.35) 15(1.25,-2.35) 16(1.75,-2.35) 25(1.75,2.35) 26(1.25,2.35) 27(0.75,2.35) 28(0.25,2.35) 29(-0.25,2.35) 30(-0.75,2.35) 31(-1.25,2.35) 32(-1.75,2.35)
  round 0.61 hole 0.305: 33(-1.372,0.025) 33(-0.025,1.321) 33(0,0)
  rect 3.45x3.45 smd paste-1.712 mask+0: 33(0,0)
  silkscreen extent -3.43,-3.16 3.16,3.16
XTAL_NX3215SA_NDK-M [mil]
  rect 34x65 smd paste+0 mask+0: 1(-50,0) 2(50,0)
  silkscreen extent -115,-36 21,36, body extent -65,-31 65,31, height 35

## Part data
C1 C3 C4 C21: library part "10uF CAP 0805 10V", "50V 10uF X5R 卤10% 0805 Multilayer Ceramic Capacitors MLCC - SMD/SMT ROHS", Case/Package=0805, Dielectric Material=Ceramic, Manufacturer="Samsung Electro-Mechanics", Manufacturer Part Number=CL21A106KBYQNNE, Max Operating Temperature=85°C, Min Operating Temperature=-55°C, Supplier Part Number=187-CL21A106KBYQNNE, Tolerance=10%, Voltage Rating=50V, Category="Ceramic Capacitors", China RoHS=Compliant, ComponentLink1Description=https://datasheet.octopart.com:443/CL21A106KBYQNNE-Samsung-Electro-Mechanics-datasheet-182022676.pdf?src-supplier=IHS, ComponentLink1URL=https://datasheet.octopart.com:443/CL21A106KBYQNNE-Samsung-Electro-Mechanics-datasheet-182022676.pdf?src-supplier=IHS, ComponentLink2Description=https://datasheet.octopart.com:443/CL21A106KBYQNNE-Samsung-Electro-Mechanics-datasheet-141347528.pdf?src-supplier=Samsung+SCT, ComponentLink2URL=https://datasheet.octopart.com:443/CL21A106KBYQNNE-Samsung-Electro-Mechanics-datasheet-141347528.pdf?src-supplier=Samsung+SCT, ComponentLink3Description=https://datasheet.octopart.com:443/CL21A106KBYQNNE-Samsung-Electro-Mechanics-datasheet-149154152.pdf?src-supplier=Future+Electronics, ComponentLink3URL=https://datasheet.octopart.com:443/CL21A106KBYQNNE-Samsung-Electro-Mechanics-datasheet-149154152.pdf?src-supplier=Future+Electronics, Height=1.45mm, Lifecycle Status=Production, Material=Ceramic, Mounting Technology="Surface Mount", Number of Terminals=2, Pricing="1=0.49, 10=0.221, 50=0.221, 100=0.197, 1000=0.146, 10000=0.123 (USD)", REACH SVHC=Yes, RoHS=Compliant, Stock=130399, Supplier=Mouser, Voltage Rating (DC)=50V
C2: library part "22uF CAP-0805-IPC-B_2", "10V 22uF X5R 卤10% 0805 Multilayer Ceramic Capacitors MLCC - SMD/SMT ROHS", Case Code (Imperial)=0805, Case Code (Metric)=2012, Dielectric=X5R, Dielectric Material=Ceramic, Manufacturer="Samsung Electro-Mechanics", Manufacturer Part Number=CL21A226KPCLRNC, Max Operating Temperature=85°C, Min Operating Temperature=-55°C, Tolerance=10%, Voltage Rating=10V, Case/Package=0805, Category="Ceramic Capacitors", China RoHS=Compliant, ComponentLink1Description=https://datasheet.octopart.com:443/CL21A226KPCLRNC-Samsung-Electro-Mechanics-datasheet-137006305.pdf?src-supplier=IHS, ComponentLink1URL=https://datasheet.octopart.com:443/CL21A226KPCLRNC-Samsung-Electro-Mechanics-datasheet-137006305.pdf?src-supplier=IHS, ComponentLink2Description=https://datasheet.octopart.com:443/CL21A226KPCLRNC-Samsung-Electro-Mechanics-datasheet-181551865.pdf?src-supplier=Newark, ComponentLink2URL=https://datasheet.octopart.com:443/CL21A226KPCLRNC-Samsung-Electro-Mechanics-datasheet-181551865.pdf?src-supplier=Newark, ComponentLink3Description=https://datasheet.octopart.com:443/CL21A226KPCLRNC-Samsung-Electro-Mechanics-datasheet-110226409.pdf?src-supplier=Future+Electronics, ComponentLink3URL=https://datasheet.octopart.com:443/CL21A226KPCLRNC-Samsung-Electro-Mechanics-datasheet-110226409.pdf?src-supplier=Future+Electronics, ComponentLink4Description=https://datasheet.octopart.com:443/CL21A226KPCLRNC-Samsung-Electro-Mechanics-datasheet-93783782.pdf?src-supplier=Future+Electronics, ComponentLink4URL=https://datasheet.octopart.com:443/CL21A226KPCLRNC-Samsung-Electro-Mechanics-datasheet-93783782.pdf?src-supplier=Future+Electronics, ComponentLink5Description=https://datasheet.octopart.com:443/CL21A226KPCLRNC-Samsung-Electro-Mechanics-datasheet-67374603.pdf?src-supplier=Future+Electronics, ComponentLink5URL=https://datasheet.octopart.com:443/CL21A226KPCLRNC-Samsung-Electro-Mechanics-datasheet-67374603.pdf?src-supplier=Future+Electronics, ComponentLink6Description=https://datasheet.octopart.com:443/CL21A226KPCLRNC-Samsung-Electro-Mechanics-datasheet-149136978.pdf?src-supplier=Future+Electronics, ComponentLink6URL=https://datasheet.octopart.com:443/CL21A226KPCLRNC-Samsung-Electro-Mechanics-datasheet-149136978.pdf?src-supplier=Future+Electronics, ComponentLink7Description=https://datasheet.octopart.com:443/CL21A226KPCLRNC-Samsung-datasheet-8326407.pdf?src-supplier=TME, ComponentLink7URL=https://datasheet.octopart.com:443/CL21A226KPCLRNC-Samsung-datasheet-8326407.pdf?src-supplier=TME, Country of Origin="Mainland China, Philippines, South Korea", Depth=1.25mm, Export Control Classification Number (ECCN) Code=EAR99, Harmonized Tariff Schedule (HTS) Code=8532.24.00.20, Height=850µm, Introduction Date=2011-04-13, Lead Free="Lead Free", Length=2mm, Lifecycle Status=Production, Material=Ceramic, Mounting Technology="Surface Mount", Number of Terminals=2, Packaging="Tape and Reel", Pricing="10=0.117, 100=0.102, 500=0.0764, 1000=0.0696, 2000=0.0605, 4000=0.0514 (GBP)", Radiation Hardening=No, REACH SVHC=Yes, RoHS=Compliant, Schedule B="8532240020, 8532240020|8532240020, 8532240020|8532240020|8532240020, 8532240020|8532240020|8532240020|8532240020", Stock=18202, Supplier=Farnell, Supplier Part Number=CL21A226KPCLRNC, Thickness=939.8µm, Voltage Rating (DC)=10V, Width=1.25mm
C5 C6: library part "1uF CAP-0805-IPC-B_1"
C7 C40: library part CAP-0603-IPC-B, Manufacturer="AVX Interconnect / Elco", Part Number=0603ZC103MAT2A
C8: library part "4.7uF CAP-0805-IPC-B_1"
C9: library part "6.8nF CAP-0603-IPC-B_2", Manufacturer="AVX Interconnect / Elco", Part Number=0603ZC103MAT2A
C10 C13 C26 C27 C28 C29 C31 C33 C34: library part CMP-03422-000048-1, "CAP CER 0.1UF 16V X7R 0402", Capacitance="100 nF", Manufacturer=YAGEO, Manufacturer Part Number=CC0402KRX7R7BB104, Package=CC0402, Temperature="-55°C to +125°C", Temperature Characteristic=X7R, Temperature Coefficient=30ppm/°C, Temperature Range High=+125°C, Temperature Range Low=-55°C, Tolerance=0.1, Voltage Rating="16 V", Automotive=No, Automotive Grade=NA, Category=Cap, ComponentLink2Description=Datasheet, ComponentLink2URL=http://www.yageo.com/documents/recent/UPY-GP_NP0_16V-to-50V_16.pdf, Device Class L1="Passive Components", Device Class L2=Capacitors, Device Class L3="Ceramic Capacitors", Digikey Description="CAP CER 0.1UF 16V X7R 0402", Footprint Url=http://www.yageo.com/exep/pages/download/literatures/UPY-C_GEN_24.pdf, Height=0.55mm, Ipc Land Pattern Name=CAPC10050X50, Lead Free=Yes, Material=Ceramic, Mouser Description="0402 0.1 uF 16 V ±10 % Tolerance X7R SMT Multilayer Ceramic Capacitor", Octopart=https://octopart.com/cc0402krx7r7bb104-yageo-42244624, RoHS=TRUE
C11 C12 C18 C19 C35: library part CMP-03422-000489-1, "CAP CER 1UF 10V X5R 0402", Capacitance="1 uF", Manufacturer=YAGEO, Manufacturer Part Number=CC0402KRX5R6BB105, Package=CC0402, Temperature="-55°C to +125°C", Temperature Characteristic=X5R, Temperature Coefficient=30ppm/°C, Temperature Range High=+125°C, Temperature Range Low=-55°C, Tolerance=0.1, Voltage Rating="10 V", Automotive=No, Automotive Grade=NA, Category=Cap, ComponentLink2Description=Datasheet, ComponentLink2URL=http://www.yageo.com/documents/recent/UPY-GP_NP0_16V-to-50V_16.pdf, Device Class L1="Passive Components", Device Class L2=Capacitors, Device Class L3="Ceramic Capacitors", Digikey Description="CAP CER 1UF 10V X5R 0402", Footprint Url=http://www.yageo.com/exep/pages/download/literatures/UPY-C_GEN_24.pdf, Height=0.55mm, Ipc Land Pattern Name=CAPC10050X50, Lead Free=Yes, Material=Ceramic, Mouser Description="Multilayer Ceramic Capacitors MLCC - SMD/SMT 1uF 10V X5R 10%", Octopart=https://octopart.com/cc0402krx5r6bb105-yageo-42244620, RoHS=TRUE
C14 C15: library part CMP-2006-02564-2, "Chip Multilayer Ceramic Capacitors for General Purpose, 0603, 4700pF, C0G, 30ppm/°C, 5%, 50V", Capacitance=4.7nF, Case Code (Imperial)=0603, Case Code (Metric)=1608, Dielectric=C0G, Max Operating Temperature=125°C, Min Operating Temperature=-55°C, Package Quantity=4000, Tolerance=5%, Voltage Rating=50V, Case/Package=0603, Height=0.8mm, Lead Free="Lead Free", Length=1.6mm, Material=Ceramic, Mount="Surface Mount", Packaging="Tape and Reel", REACH SVHC="No SVHC", Termination=SMD/SMT, Thickness=0.035inch, Voltage Rating (DC)=50V, Width=0.8mm
C16 C17 C25: library part "1nF CAP-0603-IPC-B_1", Manufacturer="AVX Interconnect / Elco", Part Number=0603ZC103MAT2A
C20: library part "100nF CAP-0603-IPC-B_1", Manufacturer="AVX Interconnect / Elco", Part Number=0603ZC103MAT2A
C22: library part CMP-06035-021399-1, "Multi-Layer Ceramic Capacitor 2.7pF C0G  ±0.1pF 0402 Paper T/R"
C23: library part CMP-2008-04287-1, Manufacturer=Murata, Part Number=GRM1555C1H1R5CA01D
C24: library part CMP-2008-04360-1, Manufacturer=Murata, Part Number=GRM1555C1H3R9CA01D
C30: library part CMP-03422-000540-1, "CAP CER 0.47UF 16V X7R 0603", Capacitance="470 nF", Manufacturer=YAGEO, Manufacturer Part Number=CC0603KRX7R7BB474, Package=CC0603-DA, Temperature="-55°C to +125°C", Temperature Characteristic=X7R, Temperature Coefficient=15%, Temperature Range High=+125°C, Temperature Range Low=-55°C, Tolerance=0.1, Voltage="16 V", Automotive=No, Category=Cap, ComponentLink2Description=Datasheet, ComponentLink2URL=http://www.yageo.com/documents/recent/UPY-GPHC_X7R_6.3V-to-50V_18.pdf, Device Class L1="Passive Components", Device Class L2=Capacitors, Device Class L3="Ceramic Capacitors", Digikey Description="CAP CER 0.47UF 16V X7R 0603", Footprint Url=http://www.yageo.com/exep/pages/download/literatures/UPY-C_GEN_24.pdf, Height=0.9mm, Lead Free=Yes, Material=Ceramic, Mouser Description="Multilayer Ceramic Capacitors MLCC - SMD/SMT 470nF 16V X7R 10%", Octopart=https://octopart.com/cc0603krx7r7bb474-yageo-8376533, RoHS=TRUE, Voltage Rating="16 V"
C32: library part CMP-2000-06074-2, "CAP CER 4.7UF 10V X5R 0603", Capacitance="4.7 uF", Manufacturer=YAGEO, Manufacturer Part Number=CC0603KRX5R6BB475, Package=CC0603-DA, Temperature="-55°C to +125°C", Temperature Characteristic=X5R, Temperature Coefficient=15%, Temperature Range High=+125°C, Temperature Range Low=-55°C, Tolerance=0.1, Voltage="10 V", Automotive=No, Category=Cap, ComponentLink2Description=Datasheet, ComponentLink2URL=http://www.yageo.com/documents/recent/UPY-GPHC_X7R_6.3V-to-50V_18.pdf, Device Class L1="Passive Components", Device Class L2=Capacitors, Device Class L3="Ceramic Capacitors", Digikey Description="CAP CER 4.7UF 10V X5R 0603", Footprint Url=http://www.yageo.com/exep/pages/download/literatures/UPY-C_GEN_24.pdf, Height=0.9mm, Lead Free=Yes, Material=Ceramic, Mouser Description="4.7µF Surface Mount, MLCC 0603 (1608 Metric) Package Ceramic Capacitors", Octopart=https://octopart.com/cc0603krx5r6bb475-yageo-9292507, RoHS=TRUE, Voltage Rating="10 V"
C36 C37: library part CMP-2008-03869-2, "Multi-Layer Ceramic Capacitor 6pF C0G  ±0.25pF 0402 Paper T/R", Capacitance=6pF, Case Code (Imperial)=0402, Case Code (Metric)=1005, Dielectric=C0G, Max Operating Temperature=125°C, Min Operating Temperature=-55°C, Package Quantity=10000, Voltage=50V, Case/Package=0402, Depth=0.5mm, Height=0.5mm, Lead Free="Lead Free", Length=1mm, Mount="Surface Mount", Packaging="Tape and Reel", Radiation Hardening=No, Termination=SMD/SMT, Thickness=0.022inch, Voltage Rating=50V, Voltage Rating (DC)=50V, Width=0.02inch
C38 C39: library part "CAP-0603_16V- 16pf_murata", "Ceramic Capacitor for Automotive 16pF  ±5% 100VDC C0G 0603 Paper T/R", Capacitance=16pF, Case Code (Imperial)=0603, Case Code (Metric)=1608, Dielectric=C0G, Max Operating Temperature=125°C, Min Operating Temperature=-55°C, Package Quantity=4000, Ratings=AEC-Q200, Tolerance=5%, Voltage Rating=100V, Case/Package=0603, Depth=0.8mm, Height=0.8mm, Length=1.6mm, Mount="Surface Mount", Packaging="Tape and Reel", Radiation Hardening=No, Termination=SMD/SMT, Thickness=0.035inch, Voltage Rating (DC)=100V, Width=0.031inch
DS1 DS2 DS3 DS4: library part CMP-007-00019-2, "LED Uni-Color Green, 100 mW, 30 mA, -55 to 100 degC, 2-Pin THD, RoHS, Bulk", Case/Package=Radial, Colour=Green, Forward Current=30mA, Forward Voltage=2.6V, Manufacturer=Lite-On, Max Operating Temperature=100°C, Min Operating Temperature=-55°C, Package Description="2-Pin Through Hole Device, Dia 3.8 mm", Package Quantity=1000, Power=100mW, Datasheet URL=http://datasheet.octopart.com/LTL-1CHG-Lite-On-datasheet-143841.pdf, Datasheet Version=Mar-00, Illumination Colour=Green, Lens Style=Dome, Luminous Intensity=12.6mcd, Manufacturer URL=http://www.us.liteon.com/, Mounting Technology=TH, Nominal Vf=2.1V, Package Reference=LTL-1CHG, Packaging=Bulk, Pins=2, RoHS Compliant=True, Viewing Angle=60degrees
E1: library part CMP-2000-05167-1, "Ceramic Antenna, 2.45 GHZ, 2 W, -40 to 125 degC, 2-Pin SMD, RoHS, Tape and Reel", Manufacturer="Johanson Technology", Maximum Frequency=2500MHz, Minimum Frequency=2400MHz, Package=2Case18-4, Category=Antenna, Datasheet URL=http://www.johansontechnology.com/datasheets/antennas/2450AT18A100.pdf, Datasheet Version="Rev. 1.3, 07/2014", Manufacturer URL=https://www.johansontechnology.com/, Type=Ceramic, Typical Antenna Gain=0.5dB
J1: library part CMP-245163-000001-1, "CONN RCPT USB2.0 TYPEC 5A", Current Rating=5/6.25/1.25/0.25A, Manufacturer=GCT, Package=0, Temperature="-40°C to +85°C", Temperature Range High=+85°C, Temperature Range Low=-40°C, Voltage Rating=20V, Automotive=No, Category=Conn, ComponentLink2Description=Datasheet, ComponentLink2URL=https://gct.co/files/drawings/usb4105.pdf, Conn Orientation="Right Angle", Contact Material=Gold,Nickel, Device Class L1=Connectors, Device Class L2="USB Connectors", Device Class L3=unset, Digikey Description="CONN RCPT USB2.0 TYPEC 5A", Height=3.46mm, Is Female=yes, Lead Free=Yes, Manufacturer Part Number=USB4105-GF-A, Number of Contacts=16, Octopart=https://octopart.com/usb4105-gf-a-gct-106627878, RoHS=TRUE, Usb Standard="USB 2.0"
J2: library part CMP-2000-05162-1, "Male Header, Pitch 2 mm, 1 x 2 Position, Height 6 mm, Tail Length 3.4 mm, -25 to 85 degC, RoHS, Bulk", Manufacturer=JST, Datasheet URL=http://datasheet.octopart.com/B2B-PH-K-S%28LF%29%28SN%29-JST-datasheet-8324864.pdf, Datasheet Version=Nov-08, Manufacturer URL=http://www.jst.com/home2.html, No of Positions=2, Pitch=2mm, Style/Orientation=StraightHeader/Plug, Termination=Crimp, Type=ShroudedHeader
J4: "ÐŸÐ¾Ñ€Ñ‚ Ð´Ð»Ñ Ð½Ð°ÑƒÑˆÐ½Ð¸ÐºÐ¾Ð²", Package=Package, Availability="Not in stock", Check_prices=https://www.snapeda.com/parts/PJ-320B/Luoyang%20Dishang%20electronics/view-part/5519978/?ref=eda, MF="Luoyang Dishang electronics", MP=PJ-320B, Price=None, SnapEDA_Link=https://www.snapeda.com/parts/PJ-320B/Luoyang%20Dishang%20electronics/view-part/5519978/?ref=snap
J5: library part CMP-15831-000009-1, "CONN HEADER VERT 2POS 2.54MM", Current Rating=3A, Manufacturer=Harwin, Temperature="-40°C to +105°C", Temperature Range High=+105°C, Temperature Range Low=-40°C, Automotive=No, Category=Conn, ComponentLink2Description=Datasheet, ComponentLink2URL=https://cdn.harwin.com/pdfs/M20-999.pdf, Conn Gender=Male, Conn Orientation=Vertical, Contact Material=Tin,Nickel, Device Class L1=Connectors, Device Class L2="Headers and Wire Housings", Device Class L3=unset, Digikey Description="CONN HEADER VERT 2POS 2.54MM", Height=8.99mm, Lead Free=Yes, Manufacturer Part Number=M20-9990246, Mouser Description="2.54mm (0.1\") Pitch SIL Vertical PC Tail Pin Header, 6.1mm mating pin height, tin, 2 contacts", Number of Contacts=2, Number of Rows=1, Octopart=https://octopart.com/m20-9990246-harwin-2590635, Package=M20-9990246, Pitch=2.54mm, RoHS=TRUE
J7: library part CMP-17439-000304-1, "CONN HEADER VERT 5POS 2.5MM", Color=Green, Contact Resistance=20mR, Flammability Rating="UL94 V-0", Housing Color=White, Insulation Color=Natural, Max Current Rating=3A, Max Operating Temperature=85°C, Max Voltage Rating (AC)=250V, Min Operating Temperature=-25°C, Connector Type=Header, Contact Finish - Mating=TIN, Contact Material=Brass, Contact Plating=Copper, Contact Shape=Square, Contact Type="Male Pin", Depth=5.75mm, Fastening Type=Detent, Housing Material=Polyamide, Insulation Material=Nylon, Lead Free="Lead Free", Length=14.9mm, Mated Stacking Heights=9.8mm, Mount="Through Hole", Number of Positions=5, Number of Rows=1, Orientation=Straight, Packaging=Bulk, Pitch=2.5mm, Series=XH, Termination=Solder, Voltage Rating=250V
L1: library part CMP-1662-00028-2, "Multilayer Type Inductor for Power Lines, 1008 (2520), 2.2μH, 20%, 0.1Ω, 1.3A", Case Code (Imperial)=1008, Case Code (Metric)=2520, Current Rating=1.3A, DC Resistance (DCR)=100mR, Inductance=2.2uH, Inductance Tolerance=20%, Max Operating Temperature=125°C, Min Operating Temperature=-55°C, Package Quantity=3000, Self Resonant Frequency=40MHz, Test Frequency=1MHz, Case/Package=1008, Core Material=Ferrite, DC Current=1.3A, Depth=2.2mm, Height=1.2mm, Height - Seated (Max)=0.039inch, Lead Free="Lead Free", Length=2.5mm, Max DC Current=1.3A, Military Standard=Not, Mount="Surface Mount", Packaging="Tape and Reel", Radiation Hardening=No, REACH SVHC="No SVHC", Series=LQM2HP_G0, Shielding=Shielded, Termination=SMD/SMT, Tolerance=20%, Width=2mm
L2: library part CMP-06042-005877-1, "Multilayer type RF Inductor 1.8nH ±0.3nH 0.08Ω 950mA 0402", Case Code (Imperial)=0402, Case Code (Metric)=1005, Current Rating=300mA, DC Resistance (DCR)=100mR, Max Operating Temperature=125°C, Min Operating Temperature=-55°C, Package Quantity=1, Self Resonant Frequency=6GHz, Test Frequency=100MHz, Case/Package=0402, Core Material=Air, DC Current=300mA, Depth=0.55mm, Height=0.5mm, Height - Seated (Max)=0.022inch, Inductance=1.8nH, Lead Free="Lead Free", Length=0.039inch, Max DC Current=300mA, Military Standard=Not, Mount="Surface Mount", Packaging="Tape and Reel", Q Factor=8, Radiation Hardening=No, Shielding=Unshielded, Termination=SMD/SMT, Width=0.02inch
L3: library part CMP-06042-003622-1, "Multilayer type RF Inductor 1.3nH ±0.3nH 0.07Ω 1000mA 0402", Case Code (Imperial)=0402, Case Code (Metric)=1005, Current=300mA, DC Resistance (DCR)=90mR, Max Operating Temperature=125°C, Min Operating Temperature=-55°C, Package Quantity=10000, Self Resonant Frequency=6GHz, Test Frequency=100MHz, Tolerance=5%, Case/Package=0402, Core Material=Air, Current Rating=300mA, DC Current=300mA, Depth=0.55mm, Height=0.5mm, Height - Seated (Max)=0.022inch, Inductance=1.3nH, Length=1mm, Max DC Current=300mA, Military Standard=Not, Mount="Surface Mount", Packaging="Tape and Reel", Q Factor=8, Radiation Hardening=No, Shielding=Unshielded, Termination=SMD/SMT, Width=0.5mm
L4: library part "LSMGA160808T470RG Feerite bead", "Description", Manufacturer_Name="Taiyo Yuden", Manufacturer_Part_Number=LSMGA160808T470RG, Copyright="Copyright (C) 2025 Ultra Librarian. All rights reserved.", Type="Ferrite Beads and Chips"
P1 P2: library part CMP-1024-00357-1, "0.025\" SQ Post Header, Through-hole, Vertical, -55 to 125 degC, 2.54 mm Pitch, 4-Pin, Male, RoHS", Manufacturer=Samtec, Temperature Range="-55 to 125 degC", ComponentLink1Description="Manufacturer URL", ComponentLink1URL=http://www.samtec.com, ComponentLink2Description=Datasheet, ComponentLink2URL=http://www.samtec.com/documents/webfiles/pdf/TSW_TH.PDF, ComponentLink3Description="Package Specification", ComponentLink3URL=http://www.samtec.com/documents/webfiles/cpdf/TSW-XXX-XX-XXX-X-XX-XXX-MKT.pdf, DatasheetVersion=F-214, Mounting Technology=Through-hole, Orientation=Vertical, PackageDescription=".025[0.64] SQ. Post Terminal Strip Assembly", PackageReference=TSW-104-08-X-S, PackageVersion="DM, 8/1988", PartNumber=TSW-104-08-G-S, Pitch="2.54 mm", RoHS=True
R1 R2 R4 R8 R9 R17 R29 R33 R36 R39: library part RES-0603-IPC-B, Case/Package=0603, Max Operating Temperature=155°C, Max Power Dissipation=100mW, Min Operating Temperature=-55°C, Resistance=4.7kR, Resistor Type="Thin Film", Temperature Coefficient=50ppm/°C, Tolerance=0.5%, Features="Moisture Resistant", Height=0.022inch, Length=0.063inch, Number of Terminations=2, Packaging="Tape and Reel", RoHS Compliant=Yes, Series=AT, Width=0.032inch
R3 R7: library part CMP-04015-097718-1, "5.1kΩ ±1% 0.1W Chip Resistor 0603 Flat Chip (Anti-Sulfuration) AEC-Q200 Qualified", Case Code (Imperial)=0603, Case Code (Metric)=1608, Max Operating Temperature=155°C, Min Operating Temperature=-55°C, Package Quantity=5000, Power Rating=100mW, Resistance=5.1kR, Temperature Coefficient=100ppm/°C, Tolerance=1%, Voltage Rating=75V, Case/Package=0603, Height=0.45mm, Length=1.6mm, Packaging="Tape and Reel", RoHS Compliant=Yes, Termination=SMD/SMT, Weight=7.1E-05oz, Width=0.8mm
R5: library part "1.87k RES-0805-IPC_B_1", "200mW Thick Film Resistors ±50ppm/℃ ±0.1% 1.87kΩ 0805 Chip Resistor - Surface Mount ROHS", Case/Package=0805, Manufacturer=Panasonic, Manufacturer Lifecycle Status=ACTIVE, Manufacturer Part Number=ERJPB6B1871V, Max Operating Temperature=155°C, Min Operating Temperature=-55°C, Power Rating=250mW, Ratings=AEC-Q200, Temperature Coefficient=50ppm/°C, Tolerance=0.1%, Working Voltage=150V, Category="Chip SMD Resistors", ComponentLink1Description=https://datasheet.octopart.com:443/ERJPB6B1871V-Panasonic-datasheet-182147307.pdf?src-supplier=IHS, ComponentLink1URL=https://datasheet.octopart.com:443/ERJPB6B1871V-Panasonic-datasheet-182147307.pdf?src-supplier=IHS, ComponentLink2Description=https://datasheet.octopart.com:443/ERJPB6B1871V-Panasonic-datasheet-82522998.pdf?src-supplier=Panasonic, ComponentLink2URL=https://datasheet.octopart.com:443/ERJPB6B1871V-Panasonic-datasheet-82522998.pdf?src-supplier=Panasonic, ComponentLink3Description=https://sigma.octopart.com:443/150570796/technical_drawing/Panasonic-ERJPB6B1871V.pdf?src-supplier=Panasonic+SCT, ComponentLink3URL=https://sigma.octopart.com:443/150570796/technical_drawing/Panasonic-ERJPB6B1871V.pdf?src-supplier=Panasonic+SCT, ComponentLink4Description=https://datasheet.octopart.com:443/ERJPB6B1871V-Panasonic-datasheet-177212511.pdf?src-supplier=Burklin+Elektronik, ComponentLink4URL=https://datasheet.octopart.com:443/ERJPB6B1871V-Panasonic-datasheet-177212511.pdf?src-supplier=Burklin+Elektronik, Height=600µm, Length=2mm, Lifecycle Status=Production, Mounting Technology="Surface Mount", Number of Terminals=2, Part Series="High Precision Thick Film Chip Resistors", Pricing="5000=0.0407 (GBP)", REACH SVHC=Yes, RoHS=Compliant, Schedule B=8533210045, Supplier=Farnell, Supplier Part Number=ERJPB6B1871V, Width=1.25mm